# Altium PCB smart_safety-PCB.PcbDoc
Units mm, origin at the board's own origin, x right, y up, seen from the top; angles counter-clockwise.
Board outline 140.97 x 75.56 mm, 2 copper layers (Top Layer, Bottom Layer); 29 components, 25 nets, 136 pads, 6 vias.
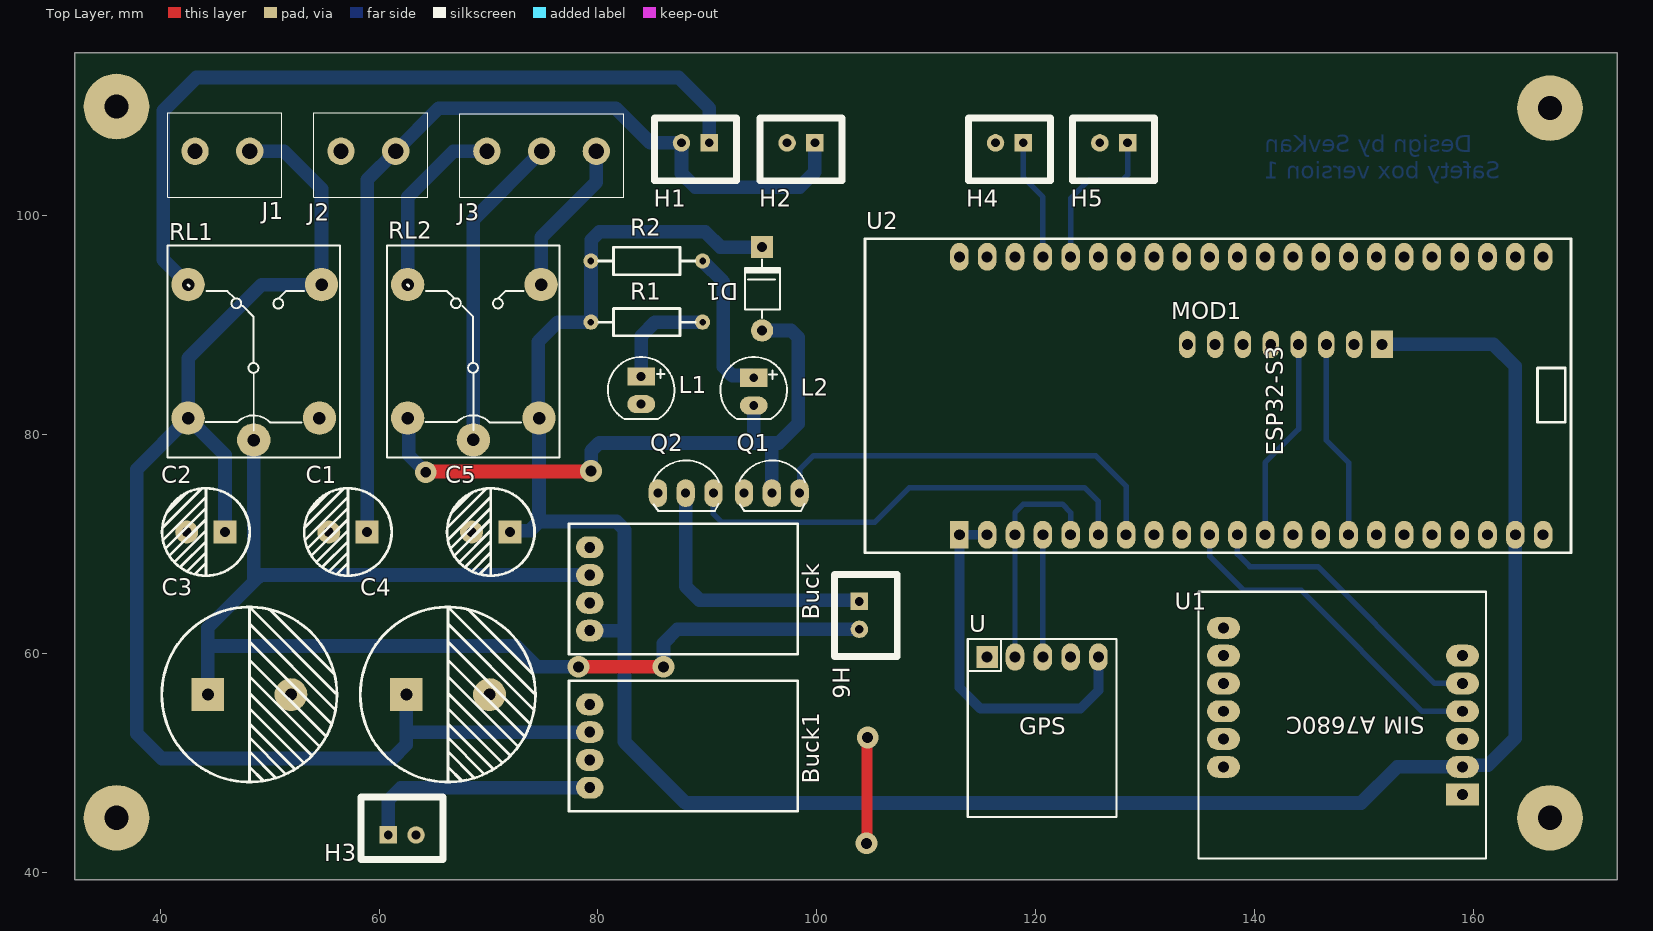
[diagram p0: Top Layer view]
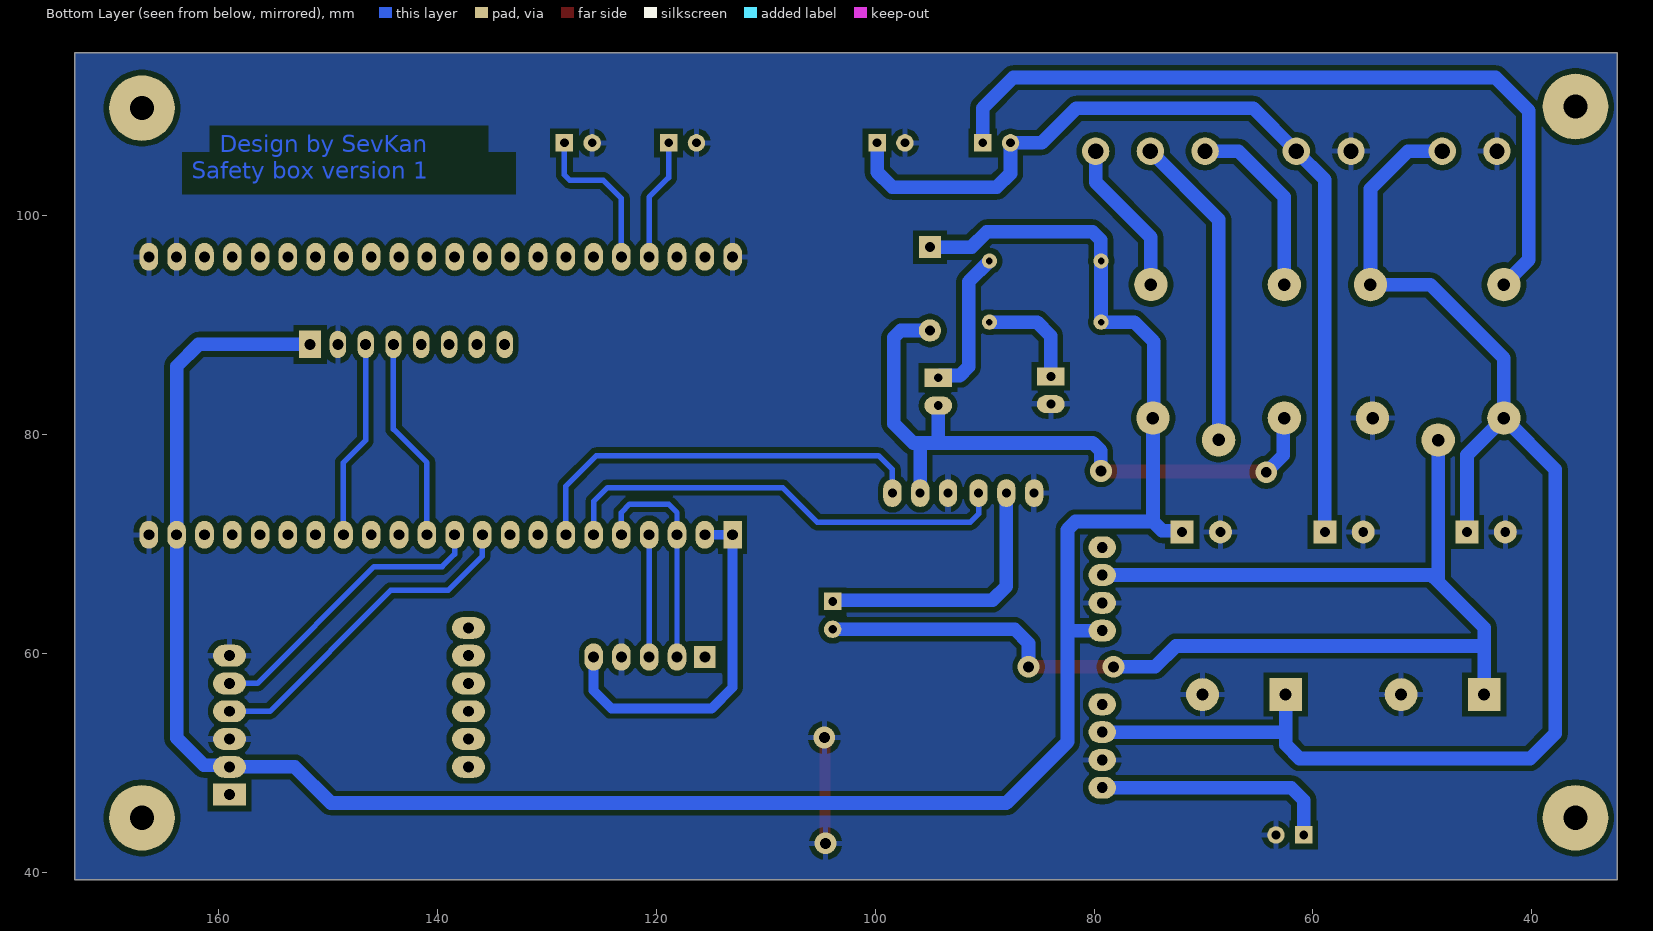
[diagram p1: Bottom Layer view, seen from below]
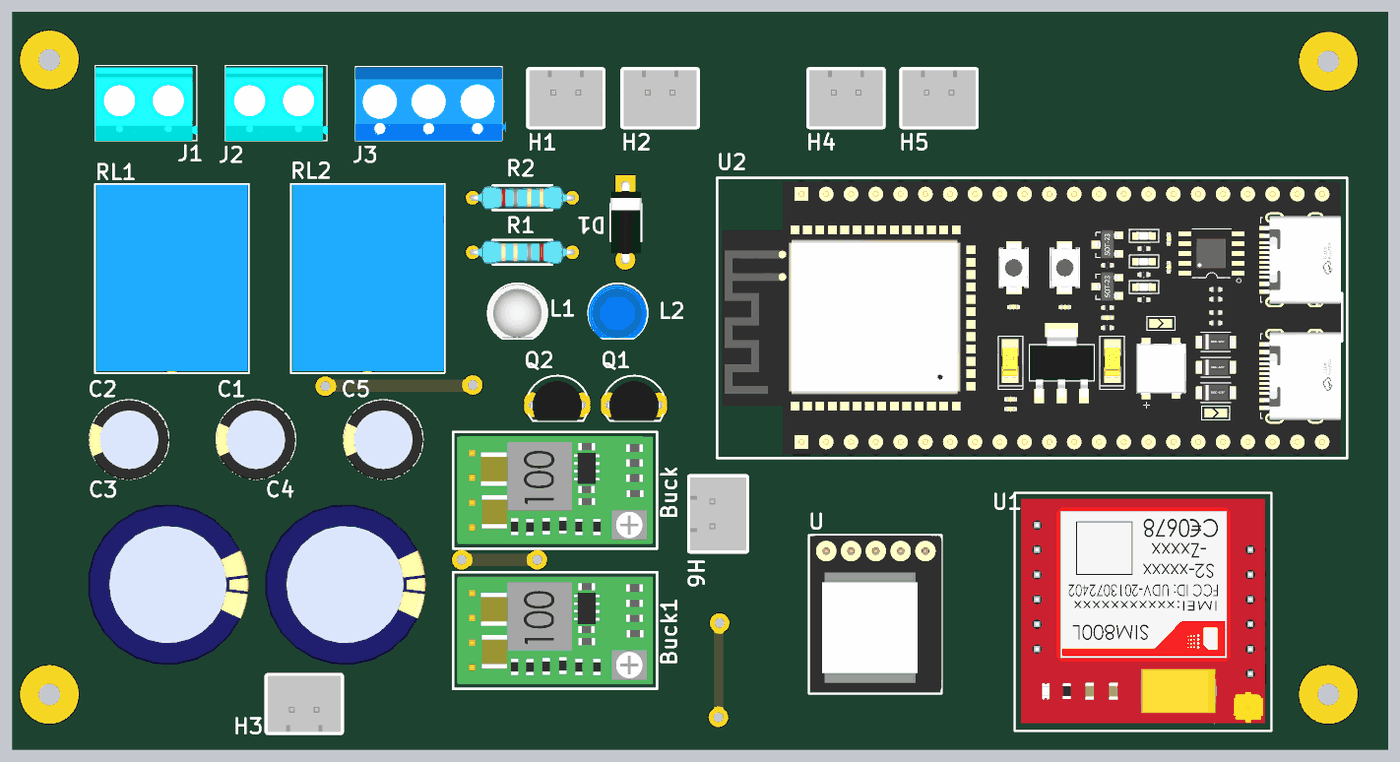
[diagram p2: 3D render of the assembled board from above, using the file's embedded part models]

## Layer stack, top to bottom
Top Solder: solder mask 0.0102, Solder Resist, Dk 3.5
Top Layer: signal copper 0.0356
Dielectric 1: dielectric 0.32, FR-4, Dk 4.8
Bottom Layer: signal copper 0.0356
Bottom Solder: solder mask 0.0102, Solder Resist, Dk 3.5

## Board outline
32.18,39.355 173.15,39.355 173.15,114.92 32.18,114.92

## Design rules (kind name [scope] priority, off if disabled: settings)
Clearance [All] p1: gap=0.5 ignorepadtopadclearanceinfootprint=FALSE
ComponentClearance [All] p1: gap=0 collisioncheckmode=3 verticalgap=0.254 showdistances=FALSE
PolygonConnect [All] p1: connectstyle=Relief reliefconductorwidth=0.5 reliefentries=4 polygonreliefangle="90 Angle" airgapwidth=0.5
RoutingVias [All] p1: holewidth=0.711 width=1.27 viastyle="Through Hole" minholewidth=0.711 minwidth=1.27 maxholewidth=0.711 maxwidth=1.27
SolderMaskExpansion [All] p1: expansion=0.102 istentingtop=FALSE
Width 5V [InNet('5V')] p1: maxlimit=1.5 minlimit=1 preferedwidth=1.25 minimp=50.000000 maximp=50.000000 favimp=50.000000
Width 5V_1 [InNet('NetD1_2')] p2: maxlimit=1.5 minlimit=1 preferedwidth=1.25 minimp=50.000000 maximp=50.000000 favimp=50.000000
Width 5V_2 [InNet('NetL2_1')] p3: maxlimit=1.5 minlimit=1 preferedwidth=1.25 minimp=50.000000 maximp=50.000000 favimp=50.000000
Width 5V_3 [InNet('NetL1_1')] p4: maxlimit=1.5 minlimit=1 preferedwidth=1.25 minimp=50.000000 maximp=50.000000 favimp=50.000000
Width 5V_4 [InNet('NetH6_1')] p5: maxlimit=1.5 minlimit=1 preferedwidth=1.25 minimp=50.000000 maximp=50.000000 favimp=50.000000
Width CHANGER [InNet('CHANGER')] p6: maxlimit=1.5 minlimit=1 preferedwidth=1.25 minimp=50.000000 maximp=50.000000 favimp=50.000000
Width 7.4V [InNet('7.4V')] p7: maxlimit=1.5 minlimit=1 preferedwidth=1.25 minimp=50.000000 maximp=50.000000 favimp=50.000000
Width 7.4V_2 [InNet('NetH1_1')] p8: maxlimit=1.5 minlimit=1 preferedwidth=1.25 minimp=50.000000 maximp=50.000000 favimp=50.000000
Width 7.4V_1 [InNet('NetBuck_2')] p9: maxlimit=1.5 minlimit=1 preferedwidth=1.25 minimp=50.000000 maximp=50.000000 favimp=50.000000
Width ON [InNet('ON')] p10: maxlimit=1.5 minlimit=1 preferedwidth=1.25 minimp=50.000000 maximp=50.000000 favimp=50.000000
Width COM [InNet('COM')] p11: maxlimit=1.5 minlimit=1 preferedwidth=1.25 minimp=50.000000 maximp=50.000000 favimp=50.000000
Width NETJ3 [InNet('NetJ3_2')] p12: maxlimit=1.5 minlimit=1 preferedwidth=1.25 minimp=50.000000 maximp=50.000000 favimp=50.000000
Width 12V [InNet('12V')] p13: maxlimit=1.5 minlimit=1 preferedwidth=1.25 minimp=50.000000 maximp=50.000000 favimp=50.000000
Width 3V3 [InNet('3V3')] p14: maxlimit=1 minlimit=0.8 preferedwidth=0.9 minimp=50.000000 maximp=50.000000 favimp=50.000000
Width Signal [All] p15: maxlimit=1 minlimit=0.4 preferedwidth=0.5 minimp=50.000000 maximp=50.000000 favimp=50.000000
29 further rules are at their usual default settings.

## Components (designator, comment, footprint, x,y, rotation, side; value= is the part's Value field where it differs from the comment)
Buck "Mini 360-3A" PCBComponent_1 79.248,69.723 r0 top
Buck1 "Mini 360-3A" PCBComponent_1 79.248,55.372 r0 top
C1 "470uF" "tu hoa 8mm" 57.15,71.12 r180 top
C2 "470uF" "tu hoa 8mm" 44.168,71.12 r180 top
C3 "4700uF" "tu hoa 16mm" 48.143,56.261 r180 top
C4 "4700uF" "tu hoa 16mm" 66.284,56.261 r180 top
C5 "1000uF" "tu hoa 8mm" 70.203,71.12 r180 top
D1 "100v" "DIODE 1A" 94.996,88.265 r270 top
H1 "SWITCH" XH2.54M-2 90.17,106.68 r180 top
H2 "IN BAT" XH2.54M-2 99.822,106.68 r180 top
H3 "PORT CHANGER" XH2.54M-2 60.833,43.434 r0 top
H4 "SOS" XH2.54M-2 118.872,106.68 r180 top
H5 "RESET" XH2.54M-2 128.397,106.68 r180 top
H6 "BUZZER" XH2.54M-2 103.886,64.77 r270 top
J1 "POWER 12V" KF3012P 48.18,105.918 r180 top
J2 "POWER 7.4V" KF3012P 61.515,105.918 r180 top
J3 "KF301-3P" KF3013P 79.85,105.918 r180 top
L1 "LED 5mm" LED-5MM-RED 83.947,85.344 r270 top
L2 "LED" LED-5MM-BLUE 94.234,84.074 r270 top
MOD1 "MOD MPU_6050" "MOD MPU-6050" 151.638,88.265 r180 top
Q1 "C1815" TO92 95.885,74.676 r0 top value=C9014
Q2 "C1815" TO92 88.011,74.676 r0 top value=C9014
R1 "330R" "tro vach 1/4w" 84.455,90.297 r0 top
R2 "330R" "tro vach 1/4w" 84.455,95.885 r180 top
RL1 "12V" "Relay 5 Chan SRD" 48.545,79.526 r90 top
RL2 "Relay" "Relay 5 Chan SRD" 68.611,79.534 r90 top
U "JP 1x5 2.54" GPS_ATMG336H 115.57,59.69 r0 top locked
U1 "SIM_A7680C" SIMCOM_A7680C 159.004,47.117 r180 top
U2 "ESP32-S3-N16R8" ESP32-S3-N16R8 113.03,70.866 r90 top locked

## Footprints (in the part's own frame and the unit in brackets; to place one, negate y for a bottom-side part, rotate by r counter-clockwise, add the part's x,y. Pads: shape width x height; smd on the part's side, far side on the other; paste and mask are expansions set on the pad)
"DIODE 1A" [mil] "Diode 1A"
  round 80 hole 35: 1(-50,0)
  rect 80x80 hole 35: 2(-350,0)
  silkscreen extent -305,-61 -95,65, body extent -366,-61 -34,65, height 122
ESP32-S3-N16R8 [mm]
  rect 2.54x1.7 hole 1: 1(0,0)
  oval 2.54x1.7 hole 1: 2(0,-2.54) 3(0,-5.08) 4(0,-7.62) 5(0,-10.16) 6(0,-12.7) 7(0,-15.24) 8(0,-17.78) 9(0,-20.32) 10(0,-22.86) 11(0,-25.4) 12(0,-27.94) 13(0,-30.48) 14(0,-33.02) 15(0,-35.56) 16(0,-38.1) 17(0,-40.64) 18(0,-43.18) 19(0,-45.72) 20(0,-48.26) 21(0,-50.8) 22(0,-53.34) 23(25.4,-53.34) 24(25.4,-50.8) 25(25.4,-48.26) 26(25.4,-45.72) 27(25.4,-43.18) 28(25.4,-40.64) 29(25.4,-38.1) 30(25.4,-35.56) 31(25.4,-33.02) 32(25.4,-30.48) 33(25.4,-27.94) 34(25.4,-25.4) 35(25.4,-22.86) 36(25.4,-20.32) 37(25.4,-17.78) 38(25.4,-15.24) 39(25.4,-12.7) 40(25.4,-10.16) 41(25.4,-7.62) 42(25.4,-5.08) 43(25.4,-2.54) 44(25.4,0)
  Top Layer lines w0.254: 0.127,0.254 0.127,0.127
  silkscreen extent -1.65,-55.88 27.05,8.64, body extent -1.27,-55.24 26.67,8.15, height 11.25
GPS_ATMG336H [mm] "5 pins, 1 row, straight, gold plating"
  oval 1.7x2.5 hole 1: 1(10.16,0) 2(7.62,0) 3(5.08,0) 4(2.54,0)
  rect 2x2 hole 1: 5(0,0)
  silkscreen extent -1.78,-14.6 11.81,1.65, body extent -1.67,-14.4 11.83,1.6, height 8.54
KF3012P [mm]
  round 2.5 hole 1.4: 1(0,0) 2(5,0)
  silkscreen extent -2.92,-3.5 7.5,4.19, body extent -3,-3.3 7.5,4.2, height 10
KF3013P [mm]
  round 2.5 hole 1.4: 1(0,0) 2(5,0) 3(10,0)
  silkscreen extent -2.5,-3.43 12.5,4.19, body extent -2.9,-3.3 12.5,4.2, height 10.08
LED-5MM-BLUE [mil] "LED 2 PIN, 5 ly , Only colour, pin to pin 110mil"
  rect 65x100 hole 32: 1(-45,0)
  oval 65x100 hole 32: 2(55,0)
  silkscreen extent -120,-120 104,120, body extent -113,-120 100,117, height 339
LED-5MM-RED [mil] "LED 2 PIN, 5 ly , Only colour,pin to pin 100mil"
  rect 65x100 hole 32: 1(0,0)
  oval 65x100 hole 32: 2(100,0)
  silkscreen extent -70,-120 154,120, body extent -65,-119 149,118, height 339
"MOD MPU-6050" [mm]
  rect 2x2.5 hole 1: 0(0,0)
  oval 1.5x2.5 hole 1: 1(2.54,0) 2(5.08,0) 3(7.62,0) 4(10.16,0) 5(12.7,0) 6(15.24,0) 7(17.78,0)
  body extent -1.99,-1.52 19.51,14.98, height 5.49
PCBComponent_1 [mm]
  oval 2.5x2 hole 1: 1(0,0) 2(0,-2.54) 3(0,-5.08) 4(0,-7.62)
  silkscreen extent -1.91,-9.78 19,2.16, body extent -1.46,-9.3 18.54,1.7, height 5.4
"Relay 5 Chan SRD" [mil] "Relay SPDT, 5 pin, 10A,W 650mil, L 800mil, H 800mil"
  round 120 hole 45: 1(0,0) 2(559.06,236.22) 3(559.06,-243.78) 4(78.74,-236.22) 5(78.74,236.22)
  silkscreen extent -63,-311 700,310, body extent -55,-306 697,304, height 602
SIMCOM_A7680C [mm]
  rect 3x2 hole 1: 1(0,0)
  oval 3x2 hole 1: 2(0,-2.54) 3(0,-5.08) 4(0,-7.62) 5(0,-10.16) 6(0,-12.7) 7(21.844,-15.24) 8(21.844,-12.7) 9(21.844,-10.16) 10(21.844,-7.62) 11(21.844,-5.08) 12(21.844,-2.54)
  silkscreen extent -2.16,-18.54 24.13,5.84, body extent -1.51,-17.94 23.49,5.19, height 7.1
TO92 [mil] "TO-92"
  oval 66x100 hole 32: 1(-100,0) 2(0,0) 3(100,0)
  silkscreen extent -117,-65 120,118, body extent -109,-66 109,95, height 245
"tro vach 1/4w" [mm]
  round 1.4 hole 0.6: 1(-5.1,0) 2(5.1,0)
  silkscreen extent -4.39,-1.25 4.42,1.25, body extent -5.38,-1.2 5.38,1.2, height 2.41
"tu hoa 8mm" [mm]
  rect 2.1x2.1 hole 0.9: 1(-1.75,0)
  round 2.1 hole 0.9: 2(1.75,0)
  silkscreen extent -4,-4 4,4, body extent -4.09,-4.07 4.1,4.13, height 14.4
"tu hoa 16mm" [mm]
  rect 3x3 hole 1.1: 1(3.8,0)
  round 3 hole 1.1: 2(-3.8,0)
  silkscreen extent -8,-8 8,8, body extent -8.25,-8.24 8.25,8.24, height 2.5
XH2.54M-2 [mm]
  rect 1.6x1.6 hole 0.8: 1(0,0)
  round 1.6 hole 0.8: 2(2.54,0)
  silkscreen extent -2.48,-2.26 5.02,3.46, body extent -2.48,-2.26 5.02,3.48, height 6.91

## Part data
Buck: "5v for system"
Buck1: "5V for changing"
C1 C2: library part "Tu Hoa 470uF 16V 8x11", "Cắm", Chung_Loai=Cắm, Don_Vi=Con, Ma_Hang=MH006550, So_Chan=2, Ten_Linh_Kien="Tụ Hóa 470uF 16V 8x11MM"
C3 C4: library part "Tu Hoa 4700uF 25V 16x25", "Cắm", Chung_Loai=Cắm, Don_Vi=Con, Ma_Hang=MH004426, So_Chan=2, Ten_Linh_Kien="Tụ Hóa 4700uF 25V 16x25MM"
C5: library part "Tu Hoa 1000uF 16V 8x20", "Cắm", Chung_Loai=Cắm, Don_Vi=Con, Ma_Hang=MH008300, So_Chan=2, Ten_Linh_Kien="Tụ Hóa 1000uF 16V 8x20MM"
D1: library part "Diode 1N4007", "Cắm", Chung_Loai=Cắm, Don_Vi=Con, Ma_Hang=MH001063, Ten_Linh_Kien="Diode 1N4007 1A (DIP)"
H1 H2 H3 H4 H5 H6: library part "Header 2P 2.54 Duc Thang", "Cắm", Chung_Loai=Cắm, Don_Vi=Con, Ma_Hang=MH001283, Ten_Linh_Kien="Header 2P XH2.54-2P Đực Thẳng"
J1 J2: library part KF301-2P, "Terminal Block 5mm Pitch 2 poles", Manufacturer_Name="Handson Technology", Datasheet Link=http://www.handsontec.com/dataspecs/terminal%20block-5mm.pdf, Geometry.Height=10mm, Manufacturer_Part_Number=KF301-2P
J3: "Terminal Block 5mm Pitch 3 Poles", Manufacturer_Name="Handson Technology", Datasheet Link=http://www.handsontec.com/dataspecs/terminal%20block-5mm.pdf, Geometry.Height=10mm, Manufacturer_Part_Number=KF301-3P
L1: library part "LED 5mm Do", "Cắm", Chung_Loai=Cắm, Don_Vi=Con, Ma_Hang=MH008967, Ten_Linh_Kien="Led 5MM Phủ Đỏ (1000c)"
L2: library part "LED 5mm Xanh Duong", "Cắm", Chung_Loai=Cắm, Don_Vi=Con, Ma_Hang=MH008987, Ten_Linh_Kien="Led 5MM Xanh Dương Đục (1000c)"
Q1 Q2: library part "Trans C1815 DIP", "NPN transistor"
R1 R2: library part "Tro Vach 1/4W 1% 330R", "Cắm", Chung_Loai=Cắm, Don_Vi=Con, Ma_Hang=MH006348, So_Chan=2, Ten_Linh_Kien="Trở Vạch 1/4w 1% 330R"
RL1 RL2: library part "Relay 5 Chan SRD", "Relay 5 Chan", Ma_Hang=MH009374, Ten="Relay 5V10A SRD-05VDC-SL-C Chính Hãng"
U: library part GPS_ATGM336H, Chung_Loai=Cắm, Don_Vi=Con, Ten_Linh_Kien="Jump Đơn Cái 2.54MM 1x20P Thẳng"
U2: "ESP32-S3-DEVKITC-1"

## Free pads (board coordinates)
  round 6 hole 2.21: 9(36,110) 10(167,109.855) 11(167,45) 12(36,45)

## Via types
v1: diameter 2, hole 1, Top Layer to Bottom Layer, 6 vias

## Nets (pads, with @x,y where several pads share a name; then routed paths per layer and width w, separated by ;. In a path a pad name is that pad's centre, name@x,y a point inside that pad or via, vN(x,y) a via of type N, cw(c..) or ccw(c..) an arc to the next point about the centre after c; other vN are vias at no path point)
3V3: U2.1 U2.2 U.1 | length 33.7
  Bottom Layer w0.9: U2.2 U2.1 113.03,56.896 114.935,54.991 124.079,54.991 125.73,56.642 U.1
5V: Buck.4 C5.1 D1.2 MOD1.0 R1.1 R2.2 RL2.4 U1.2 U2.21 | length 213
  Bottom Layer w1.25: C5.1 72.08,71.247 73.787,71.247 74.611,72.071 ; Buck.4 82.296,62.103 82.423,61.976 ; D1.2 91.186,97.155 89.789,98.552 80.137,98.552 79.384,97.799 79.384,95.914 R2.2 R1.1 76.327,90.297 74.549,88.519 74.549,81.596 RL2.4 74.611,72.071 ; MOD1.0 161.833,88.265 163.83,86.268 U2.21 163.83,52.294 161.336,49.801 159.148,49.801 U1.2 153.035,49.657 149.733,46.355 88.011,46.355 82.423,51.943 82.423,61.976 ; 74.611,72.071 81.691,72.071 82.423,71.339 82.423,61.976
7.4V: C1.1 H1.2 H2.1 J2.1 | length 83.8
  Bottom Layer w1.25: C1.1@58.801,71.219 C1.1 58.9,103.303 J2.1 65.452,109.855 81.614,109.855 84.789,106.68 H1.2 87.63,103.886 88.9,102.616 98.425,102.616 99.822,104.013 H2.1
12V: Buck1.2 C2.1 C4.1 J1.1 RL1.3 RL1.5 | length 126.5
  Bottom Layer w1.25: C2.1 45.918,78.153 RL1.5 ; J1.1 51.308,105.918 54.737,102.489 RL1.3 49.276,93.726 42.545,86.995 RL1.5 ; C4.1@62.484,55.499 62.484,52.959 ; Buck1.2 62.611,52.832 62.484,52.959 ; RL1.5 37.846,76.827 37.846,52.705 40.132,50.419 61.214,50.419 62.484,51.689 62.484,52.959
BUZER: Q2.3 U2.6 | length 42.3
  Bottom Layer w0.5: Q2.3 90.551,72.771 91.313,72.009 105.283,72.009 108.458,75.184 124.46,75.184 125.73,73.914 U2.6
CHANGER: Buck1.4 H3.1 | length 22.1
  Bottom Layer w1.25: H3.1 60.833,46.609 61.976,47.752 Buck1.4
COM: J3.3 RL2.2 | length 17
  Bottom Layer w1.25: RL2.2 62.611,101.727 66.802,105.918 J3.3
GND: Buck1.3 Buck.3 C1.2 C2.2 C3.2 C4.2 C5.2 H2.2 H3.2 H4.2 H5.2 J1.2 J2.2 L1.2 MOD1.1 Q1.1 Q2.1 RL1.4 U1.3 U1.6 U2.22 U2.23 U2.24 U2.44 U.2 | length 9.7
  Top Layer w1: v1(104.521,42.672) 104.584,42.735 104.584,52.261 v1(104.648,52.324)
GPS_RX: U2.3 U2.5 U.4 | length 21
  Bottom Layer w0.5: U.4 U2.3 118.11,72.898 118.872,73.66 122.428,73.66 123.19,72.898 U2.5
GPS_TX: U2.4 U.3 | length 11.2
  Bottom Layer w0.5: U.3 U2.4
KEY: Q1.3 U2.7 | length 38.1
  Bottom Layer w0.5: Q1.3 98.425,76.835 99.695,78.105 125.476,78.105 128.27,75.311 U2.7
NetBuck_2: Buck.2 C3.1 H6.2 RL1.1 | length 119.8
  Top Layer w1.25: v1(78.232,58.801) v1(85.979,58.801)
  Bottom Layer w1.25: C3.1@44.333,55.499 44.333,60.579 ; RL1.1 48.545,66.579 ; v1(78.232,58.801) 74.422,58.801 72.517,60.706 44.46,60.706 44.333,60.579 ; Buck.2 49.149,67.183 48.545,66.579 ; v1(85.979,58.801) 85.979,60.96 87.249,62.23 H6.2 ; 44.333,60.579 44.333,62.367 48.545,66.579
NetD1_1: D1.1 L2.2 Q1.2 RL2.5 | length 62.1
  Top Layer w1.25: v1(64.262,76.581) 64.325,76.644 79.311,76.644 v1(79.375,76.708)
  Bottom Layer w1.25: RL2.5 62.713,81.432 62.713,78.135 64.262,76.586 v1(64.262,76.581) ; v1(79.375,76.708) 79.375,78.516 80.107,79.248 94.234,79.248 ; L2.2 94.234,79.248 ; D1.1 97.663,89.535 98.298,88.9 98.298,81.026 96.52,79.248 95.631,79.248 ; Q1.2 95.885,78.994 95.631,79.248 ; 94.234,79.248 95.631,79.248
NetH1_1: H1.1 RL1.2 | length 72.3
  Bottom Layer w1.25: RL1.2 40.259,96.012 40.259,109.601 43.307,112.649 87.376,112.649 90.17,109.855 H1.1
NetH6_1: H6.1 Q2.2 | length 25
  Bottom Layer w1.25: Q2.2 88.011,66.167 89.281,64.897 103.759,64.897 H6.1
NetJ3_2: J3.2 RL2.1 | length 29
  Bottom Layer w1.25: RL2.1 68.611,99.679 J3.2
NetL1_1: L1.1 R1.2 | length 9.8
  Bottom Layer w1.25: L1.1 83.947,89.027 85.217,90.297 R1.2
NetL2_1: L2.1 R2.1 | length 13.6
  Bottom Layer w1.25: R2.1 91.44,94 91.44,86.233 92.256,85.417 94.034,85.417 L2.1
ON: J3.1 RL2.3 | length 14.3
  Bottom Layer w1.25: RL2.3 74.803,98.044 79.85,103.091 J3.1
RESET: H4.1 U2.41 | length 11.2
  Bottom Layer w0.5: H4.1 118.872,103.505 120.65,101.727 U2.41
SCL: MOD1.2 U2.15 | length 18.2
  Bottom Layer w0.5: MOD1.2 146.558,79.502 148.59,77.47 U2.15
SDA: MOD1.3 U2.12 | length 18.7
  Bottom Layer w0.5: U2.12 140.97,77.47 144.018,80.518 MOD1.3
SIM_RX: U1.4 U2.10 | length 30.9
  Bottom Layer w0.5: U2.10 135.89,68.917 139.021,65.786 144.272,65.786 155.321,54.737 U1.4
SIM_TX: U1.5 U2.11 | length 27.2
  Bottom Layer w0.5: U2.11 138.43,69.088 139.573,67.945 145.796,67.945 156.464,57.277 U1.5
SOS: H5.1 U2.40 | length 14.4
  Bottom Layer w0.5: U2.40 123.19,101.6 124.841,103.251 127.889,103.251 128.397,103.759 H5.1
pads on no net: Buck1.1 Buck.1 MOD1.4 MOD1.5 MOD1.6 MOD1.7 U1.1 U1.7 U1.8 U1.9 U1.10 U1.11 U1.12 U2.8 U2.9 U2.13 U2.14 U2.16 U2.17 U2.18 U2.19 U2.20 U2.25 U2.26 U2.27 U2.28 U2.29 U2.30 U2.31 U2.32 U2.33 U2.34 U2.35 U2.36 U2.37 U2.38 U2.39 U2.42 U2.43 U.5

## Polygon pours and split planes (outlines as drawn)
GND on Bottom Layer "NONET_L-01_P-001" (solid, pour order 0): 32.18,39.355 32.18,114.92 173.15,114.92 173.15,39.355

## Other copper
Bottom Layer:
  text "Design by SevKan" at 159.889,105.81 h1.52
  text "Safety box version 1" at 162.443,103.397 h1.52

## Text inside footprints (layer, text, board x,y; h text height)
U: Top Overlay "GPS" at 118.491,52.578 h1.52
U1: Top Overlay "SIM A7680C" at 155.575,54.229 h1.52 r180
U2: Top Overlay "ESP32-S3" at 142.621,78.105 h1.52 r90